# Altium PCB B-60-30-B.PcbDoc (part 2 of 3)
Units mm, origin at the board's own origin, x right, y up, seen from the top; angles counter-clockwise.
Board outline 70.1 x 39.1 mm, 6 copper layers (Top Layer, G1, S1, S2, G2, Bottom Layer), stack 2.011 mm thick; 241 components, 129 nets, 632 pads, 875 vias.
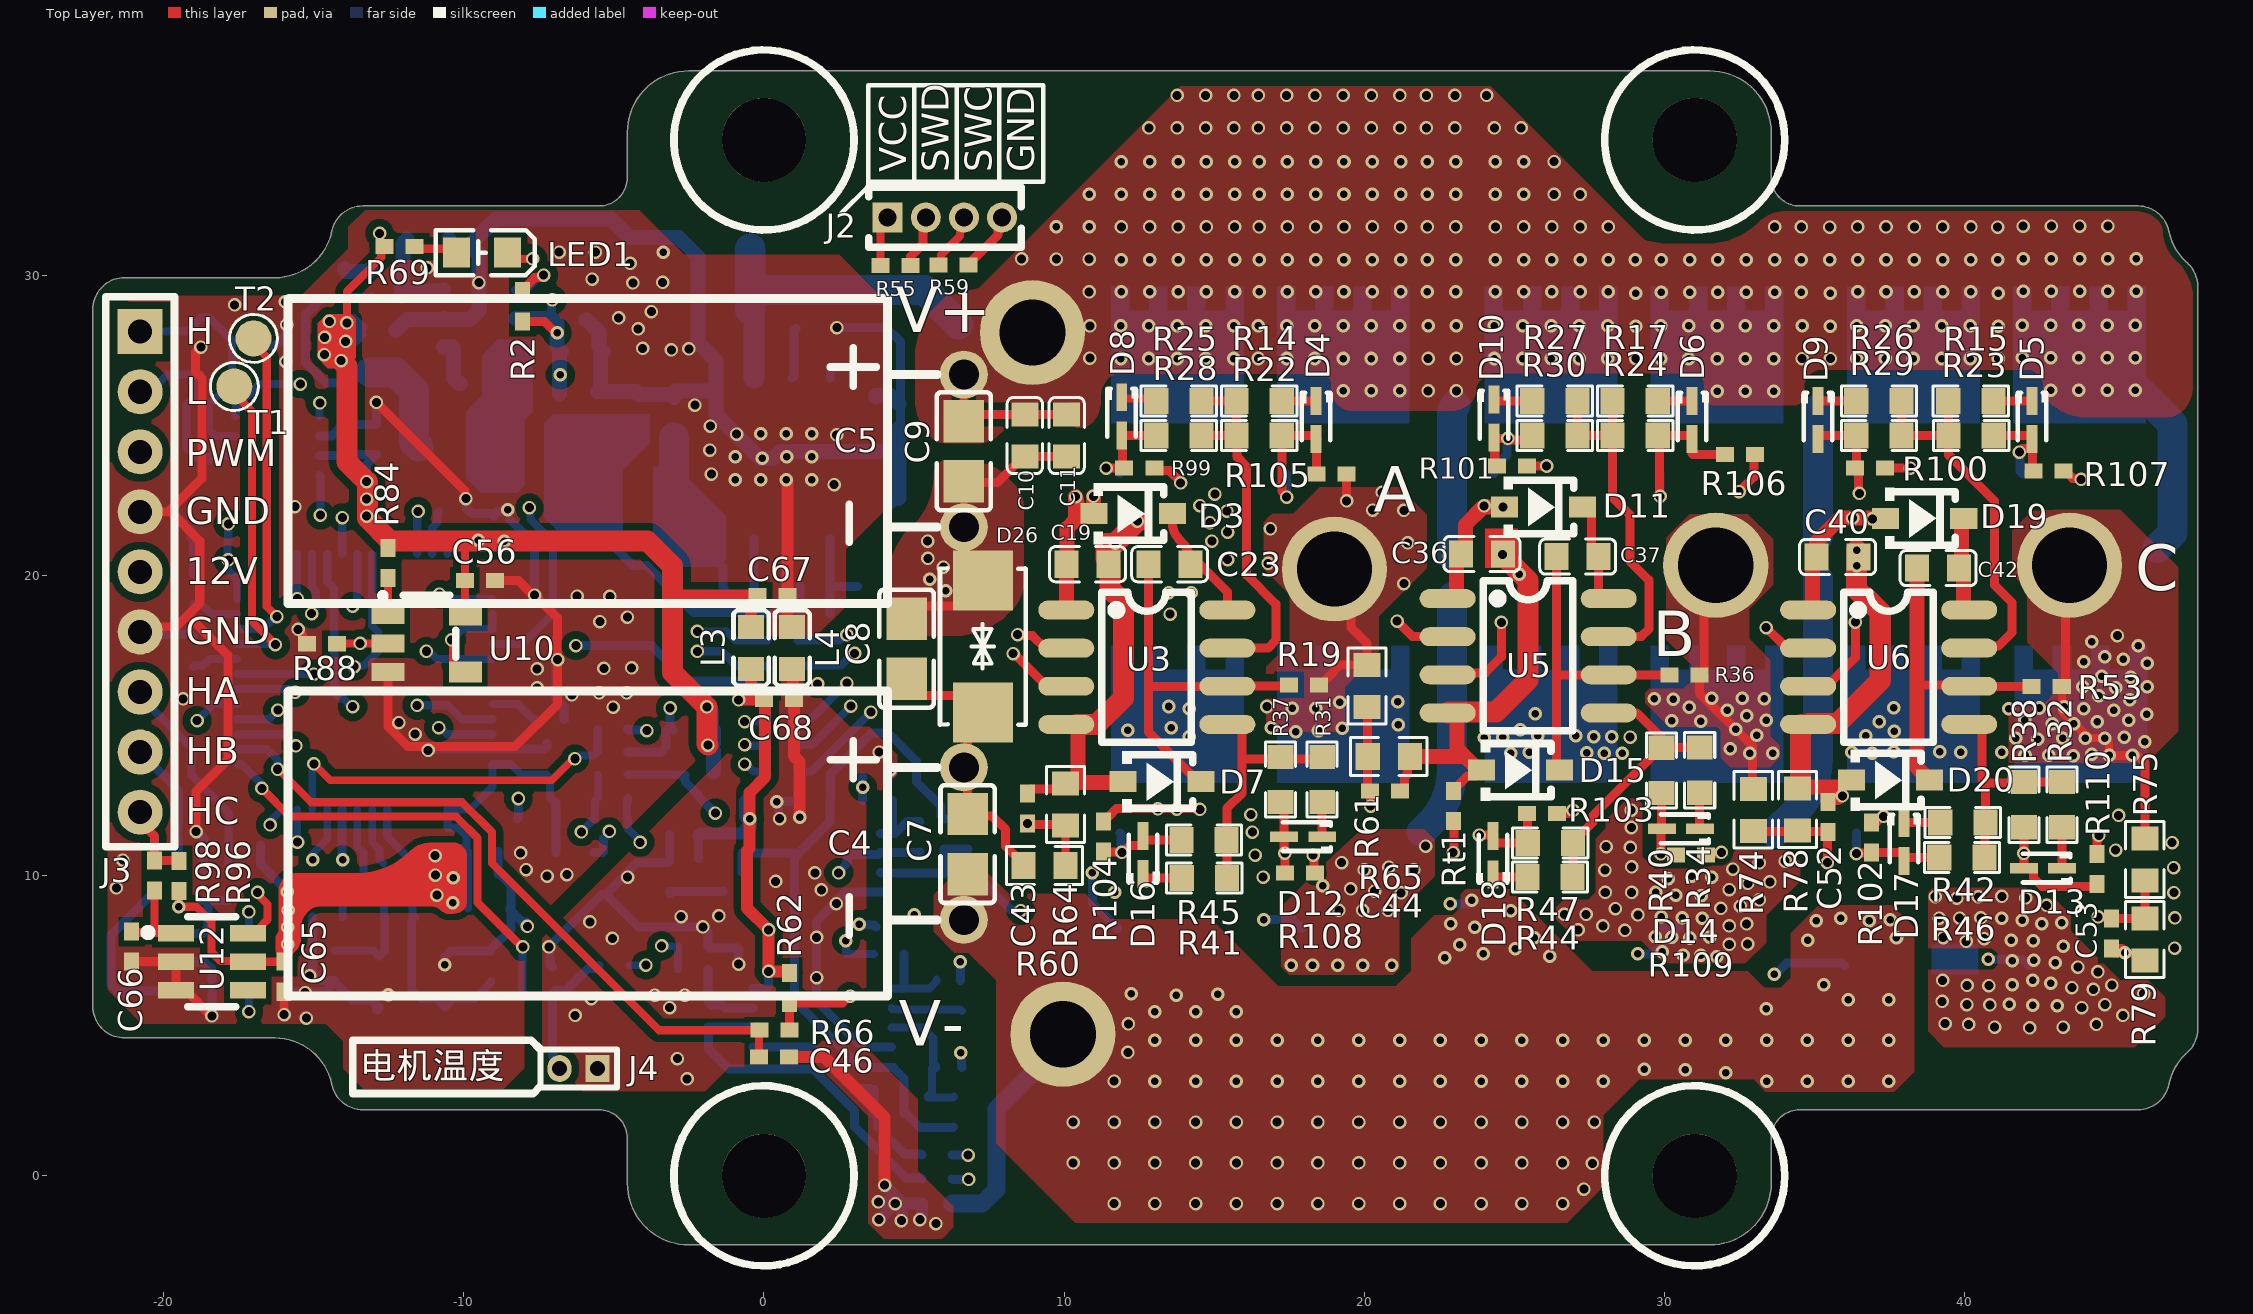
[diagram p0: Top Layer view]

## Via types
v1: diameter 0.45, hole 0.3, Top Layer to Bottom Layer, 450 vias
v2: diameter 0.45, hole 0.25, Top Layer to Bottom Layer, 425 vias

## Nets (pads, with @x,y where several pads share a name; then routed paths per layer and width w, separated by ;. In a path a pad name is that pad's centre, name@x,y a point inside that pad or via, vN(x,y) a via of type N, cw(c..) or ccw(c..) an arc to the next point about the centre after c; other vN are vias at no path point) (continued)
GND: (continued)
  other v1: 5.73,-1.59 -15.24,5.25 -15.28,6.1 -15.13,6.66 -21.57,9.59 -7.22,9.98 -6.56,10.03 -7.92,10.2 -21.35,10.51 -8.1,10.752 -11.18,14.17 -11.62,14.71 -12.16,15.09 -5.02,15.61 -19.34,15.88 -6.395,16.017 -5.49,16.08 -4.57,16.08 -7.55,16.25 -7.55,16.88 -5.33,16.9 -4.41,16.92 -5.46,18.46 -4.55,18.61 -5.13,19.3 -6.22,19.31 24.59,20.69 -15.62,22.29 2.34,23.02 -1.75,23.37 -1.8,24.17 2.42,24.68 -0.91,24.701 -1.78,24.97 -2.3,25.67 -15.92,27.12 -3.08,27.51 -4.04,27.56 -2.5,27.54 -4.19,28.21 -4.84,28.57 -3.75,28.78 -17.63,29.01 -15.94,29.11 -4.363,29.743 -3.377,29.759 -5.72,29.86 -11.22,30.24 -4.46,30.39 -6.82,30.761 -5.61,30.761
  other v2: -12.51,6.03 -10.63,7.021 36.39,20.325 -0.95,23.18 -0.103,23.18 1.59,23.18 -0.05,23.89 -0.95,23.94 0.76,23.94 1.59,23.94 -0.103,24.72 0.743,24.72 1.59,24.72 -3.36,30.761
HA: R14.1 R22.1 R25.1 R28.1 U3.7 | length 12.6
  Top Layer w0.3: R28.1@14.572,24.66 R22.1@15.741,24.66 ; R25.1@14.572,25.803 R14.1@15.741,25.803 R22.1@15.741,24.66 ; U3.7@15.434,17.574 16.794,17.574 17.05,17.83 17.05,19.04 16.08,20.01 16.08,23.62 15.76,23.94 15.76,24.641 R22.1@15.741,24.66
HB: R17.1 R24.1 R27.1 R30.1 U5.7 | length 11.8
  Top Layer w0.3: R27.1@27.094,25.803 R30.1@27.094,24.66 R24.1@28.237,24.66 ; U5.7@28.134,17.955 28.143,17.964 29.225,17.964 29.471,18.21 29.471,19.839 28.84,20.47 28.84,22.01 28.263,22.587 R24.1@28.263,24.66 R17.1@28.263,25.803
HC: R15.1 R23.1 R26.1 R29.1 U6.7 | length 12.4
  Top Layer w0.3: R26.1@37.889,25.803 R29.1@37.889,24.66 R23.1@39.448,24.66 ; 39.444,25.321 39.448,25.317 R23.1@39.448,24.66 ; U6.7@40.142,17.575 40.206,17.638 41.108,17.638 41.56,18.09 41.56,19.1 40.98,19.68 40.98,22.48 39.452,24.008 R23.1@39.452,24.66 R23.1@39.448,24.66
HLA: J3.7 R80.1 R82.2 | length 7.2
  Bottom Layer w0.27: J3.7@-20.776,16.113 -20.776,15.964 -19.07,14.258 -19.07,13.34 -17.826,12.096 R82.2@-17.826,10.167 R82.2@-17.82,10.174
HLA1: U4.16 U8.4 | length 9.9
  S1 w0.27: v1(-17.15,8.79) -17.15,8.86 -17.814,9.524 -17.814,13.833 -16.19,15.457 v1(-16.19,15.51)
  Bottom Layer w0.27: U4.16@-17.545,15.207 -16.488,15.207 -16.187,15.508 v1(-16.19,15.51) v1(-16.19,15.51) ; U8.4@-17.188,8.077 -17.08,8.185 -17.15,8.255 v1(-17.15,8.79)
HLB: J3.8 R87.2 R91.2 | length 4.9
  Bottom Layer w0.27: R91.2@-20.3,10.487 R87.2@-19.604,10.487
  Bottom Layer w0.3: J3.8@-20.776,14.113 -19.499,12.836 -19.499,11.761 -19.539,11.721 -19.539,11.2 -19.499,11.16 -19.499,10.511 R87.2@-19.475,10.487
HLB1: U4.17 U8.6 | length 12.7
  S1 w0.27: v1(-18.88,15.16) -18.294,14.574 -18.294,6.614 v1(-17.15,5.47)
  Bottom Layer w0.27: v1(-18.88,15.16) -18.333,15.707 U4.17@-17.545,15.707 ; U8.6@-17.188,6.177 -17.15,6.139 v1(-17.15,5.47)
HLC: J3.9 R96.2 R98.2 | length 2.6
  Top Layer w0.3: J3.9@-20.776,12.113 -20.776,11.788 -20.293,11.305 R98.2@-20.293,10.5 R96.2@-19.48,10.5
HLC1: U4.18 U12.6 | length 11.5
  Top Layer w0.27: U12.6@-17.188,8.077 -16.863,8.077 -16.86,8.08 -16.86,8.212 -16.536,8.536 -16.536,9.044 -16.86,9.368 v1(-16.86,9.44)
  S1 w0.27: v1(-16.86,9.44) -16.86,9.459 -17.334,9.933 -17.334,13.498 -15.576,15.256 -15.576,15.269 -15.576,16.066 v1(-15.61,16.1)
  Bottom Layer w0.27: U4.18@-17.545,16.207 -15.766,16.207 -15.659,16.1 v1(-15.61,16.1)